# Altium PCB Expansion_Board_LDO Ver_for_MSP430.PcbDoc (part 1 of 2)
Units mil, origin at the board's own origin, x right, y up, seen from the top; angles counter-clockwise.
Board outline 6000 x 4000 mil, 2 copper layers (Top Layer, Bottom Layer); 157 components, 146 nets, 583 pads, 420 vias.
Unrouted connection lines stored in the file: 1.
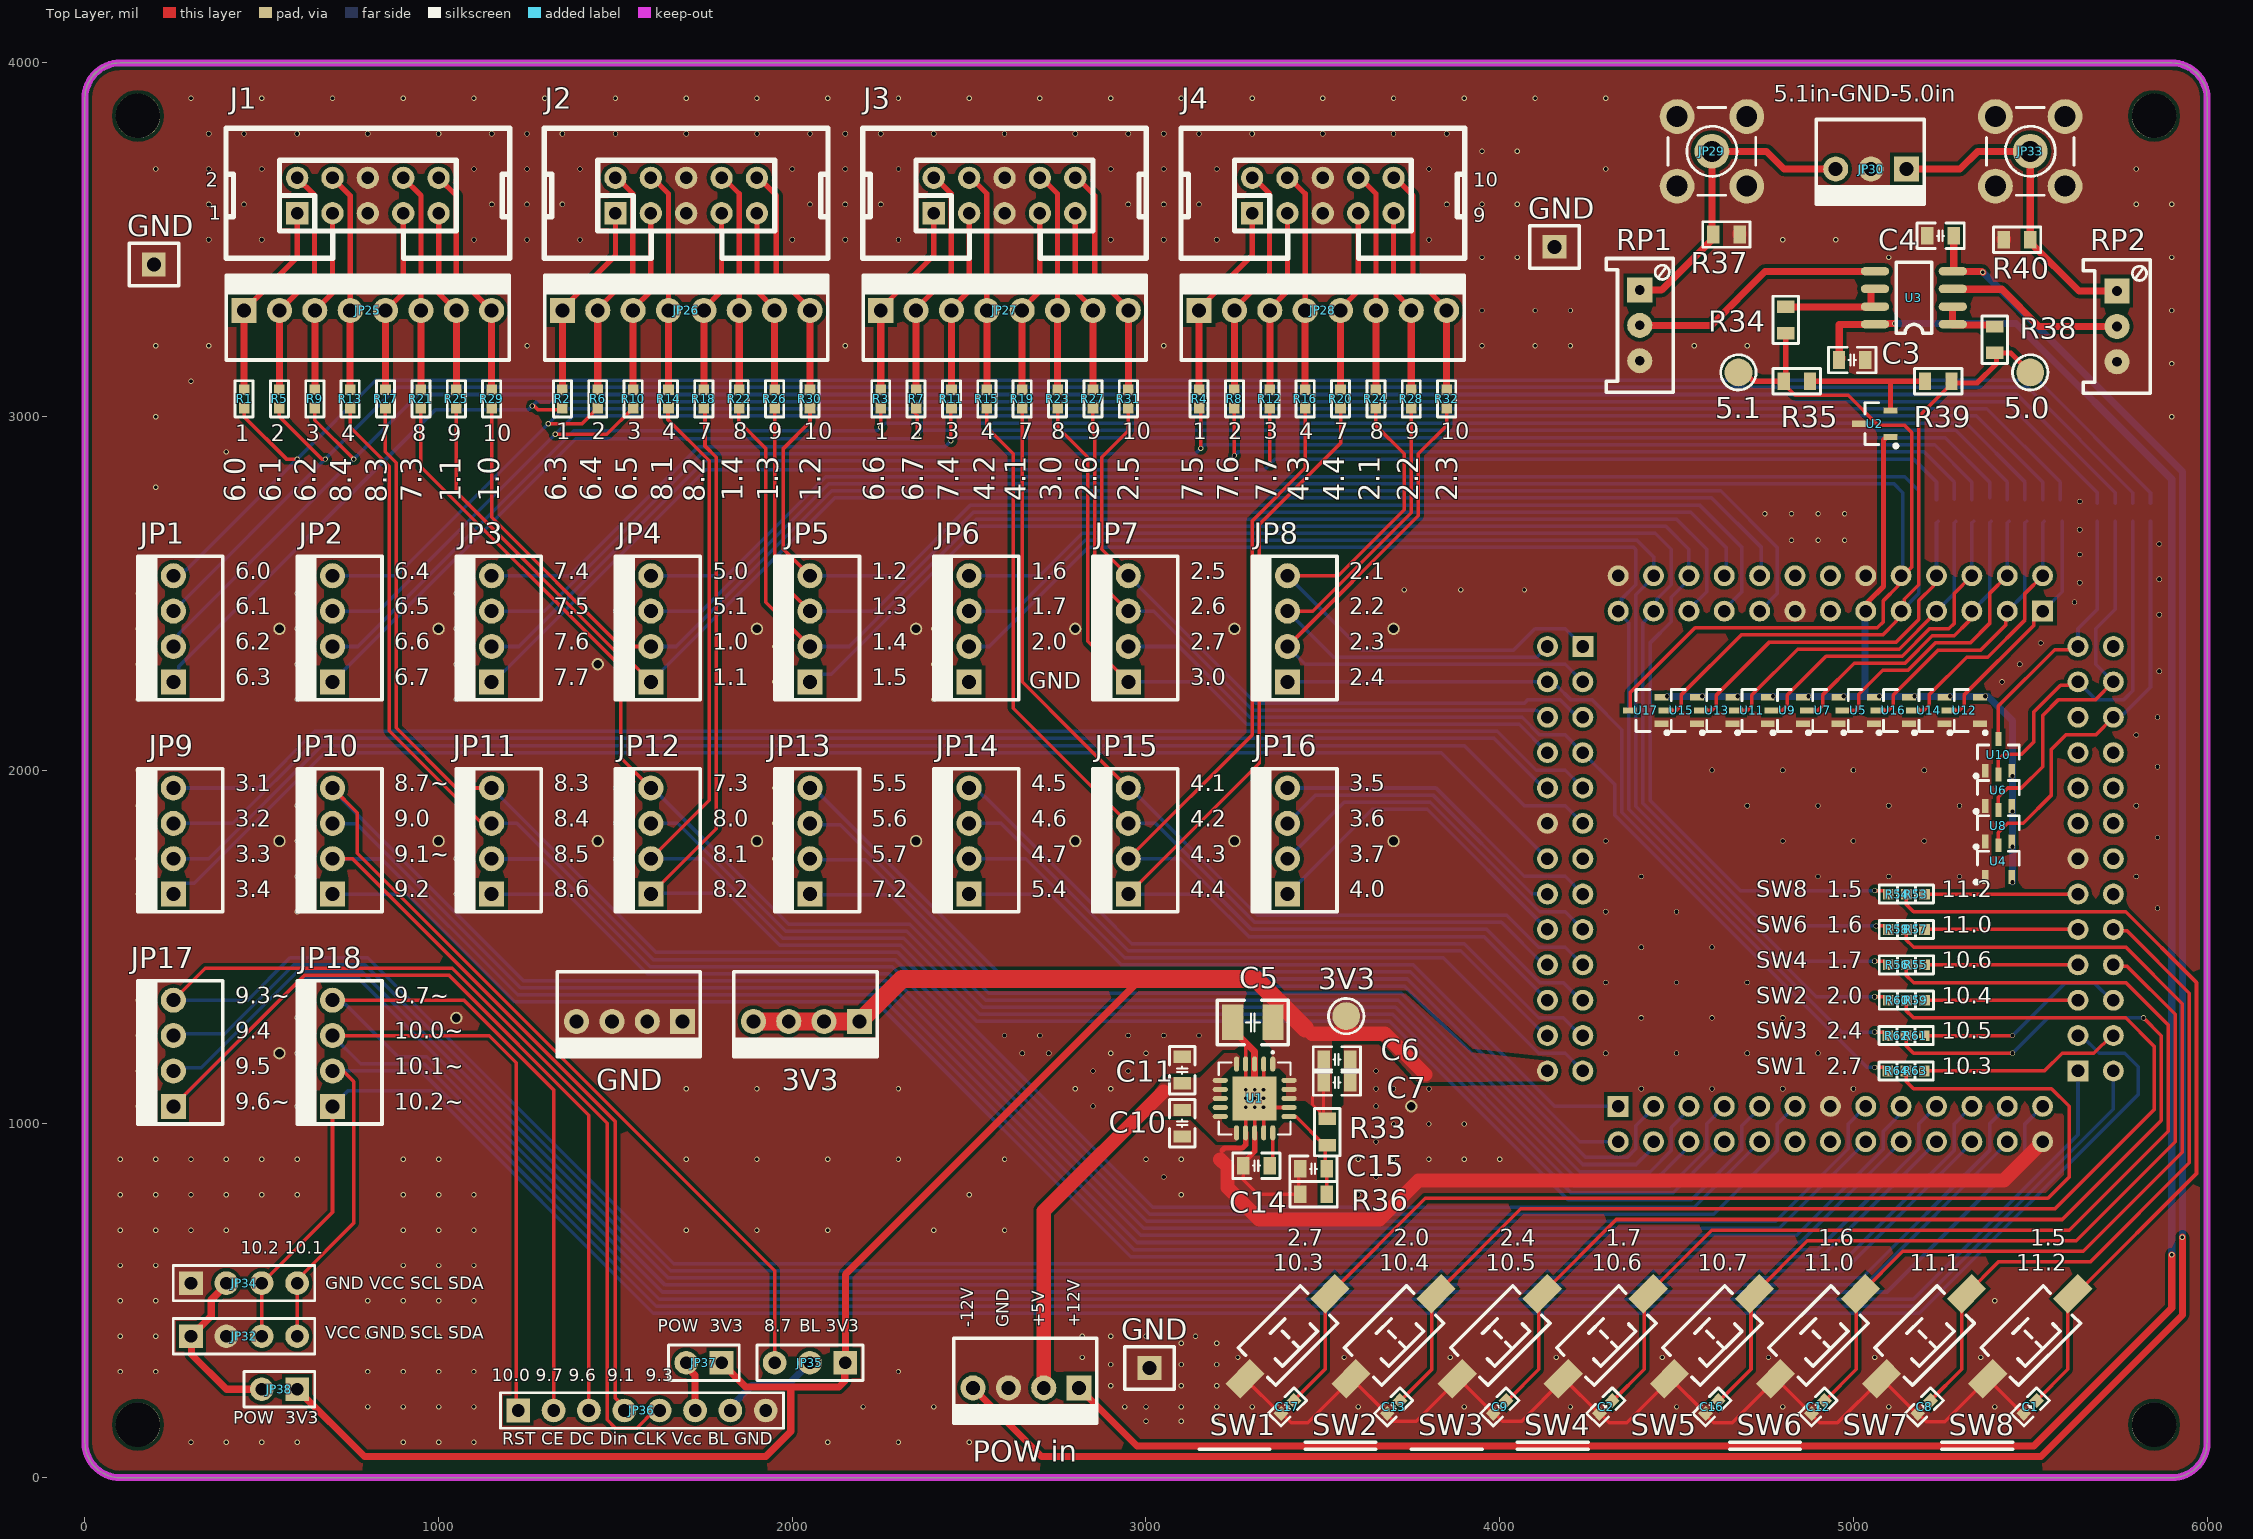
[diagram p0: Top Layer view]
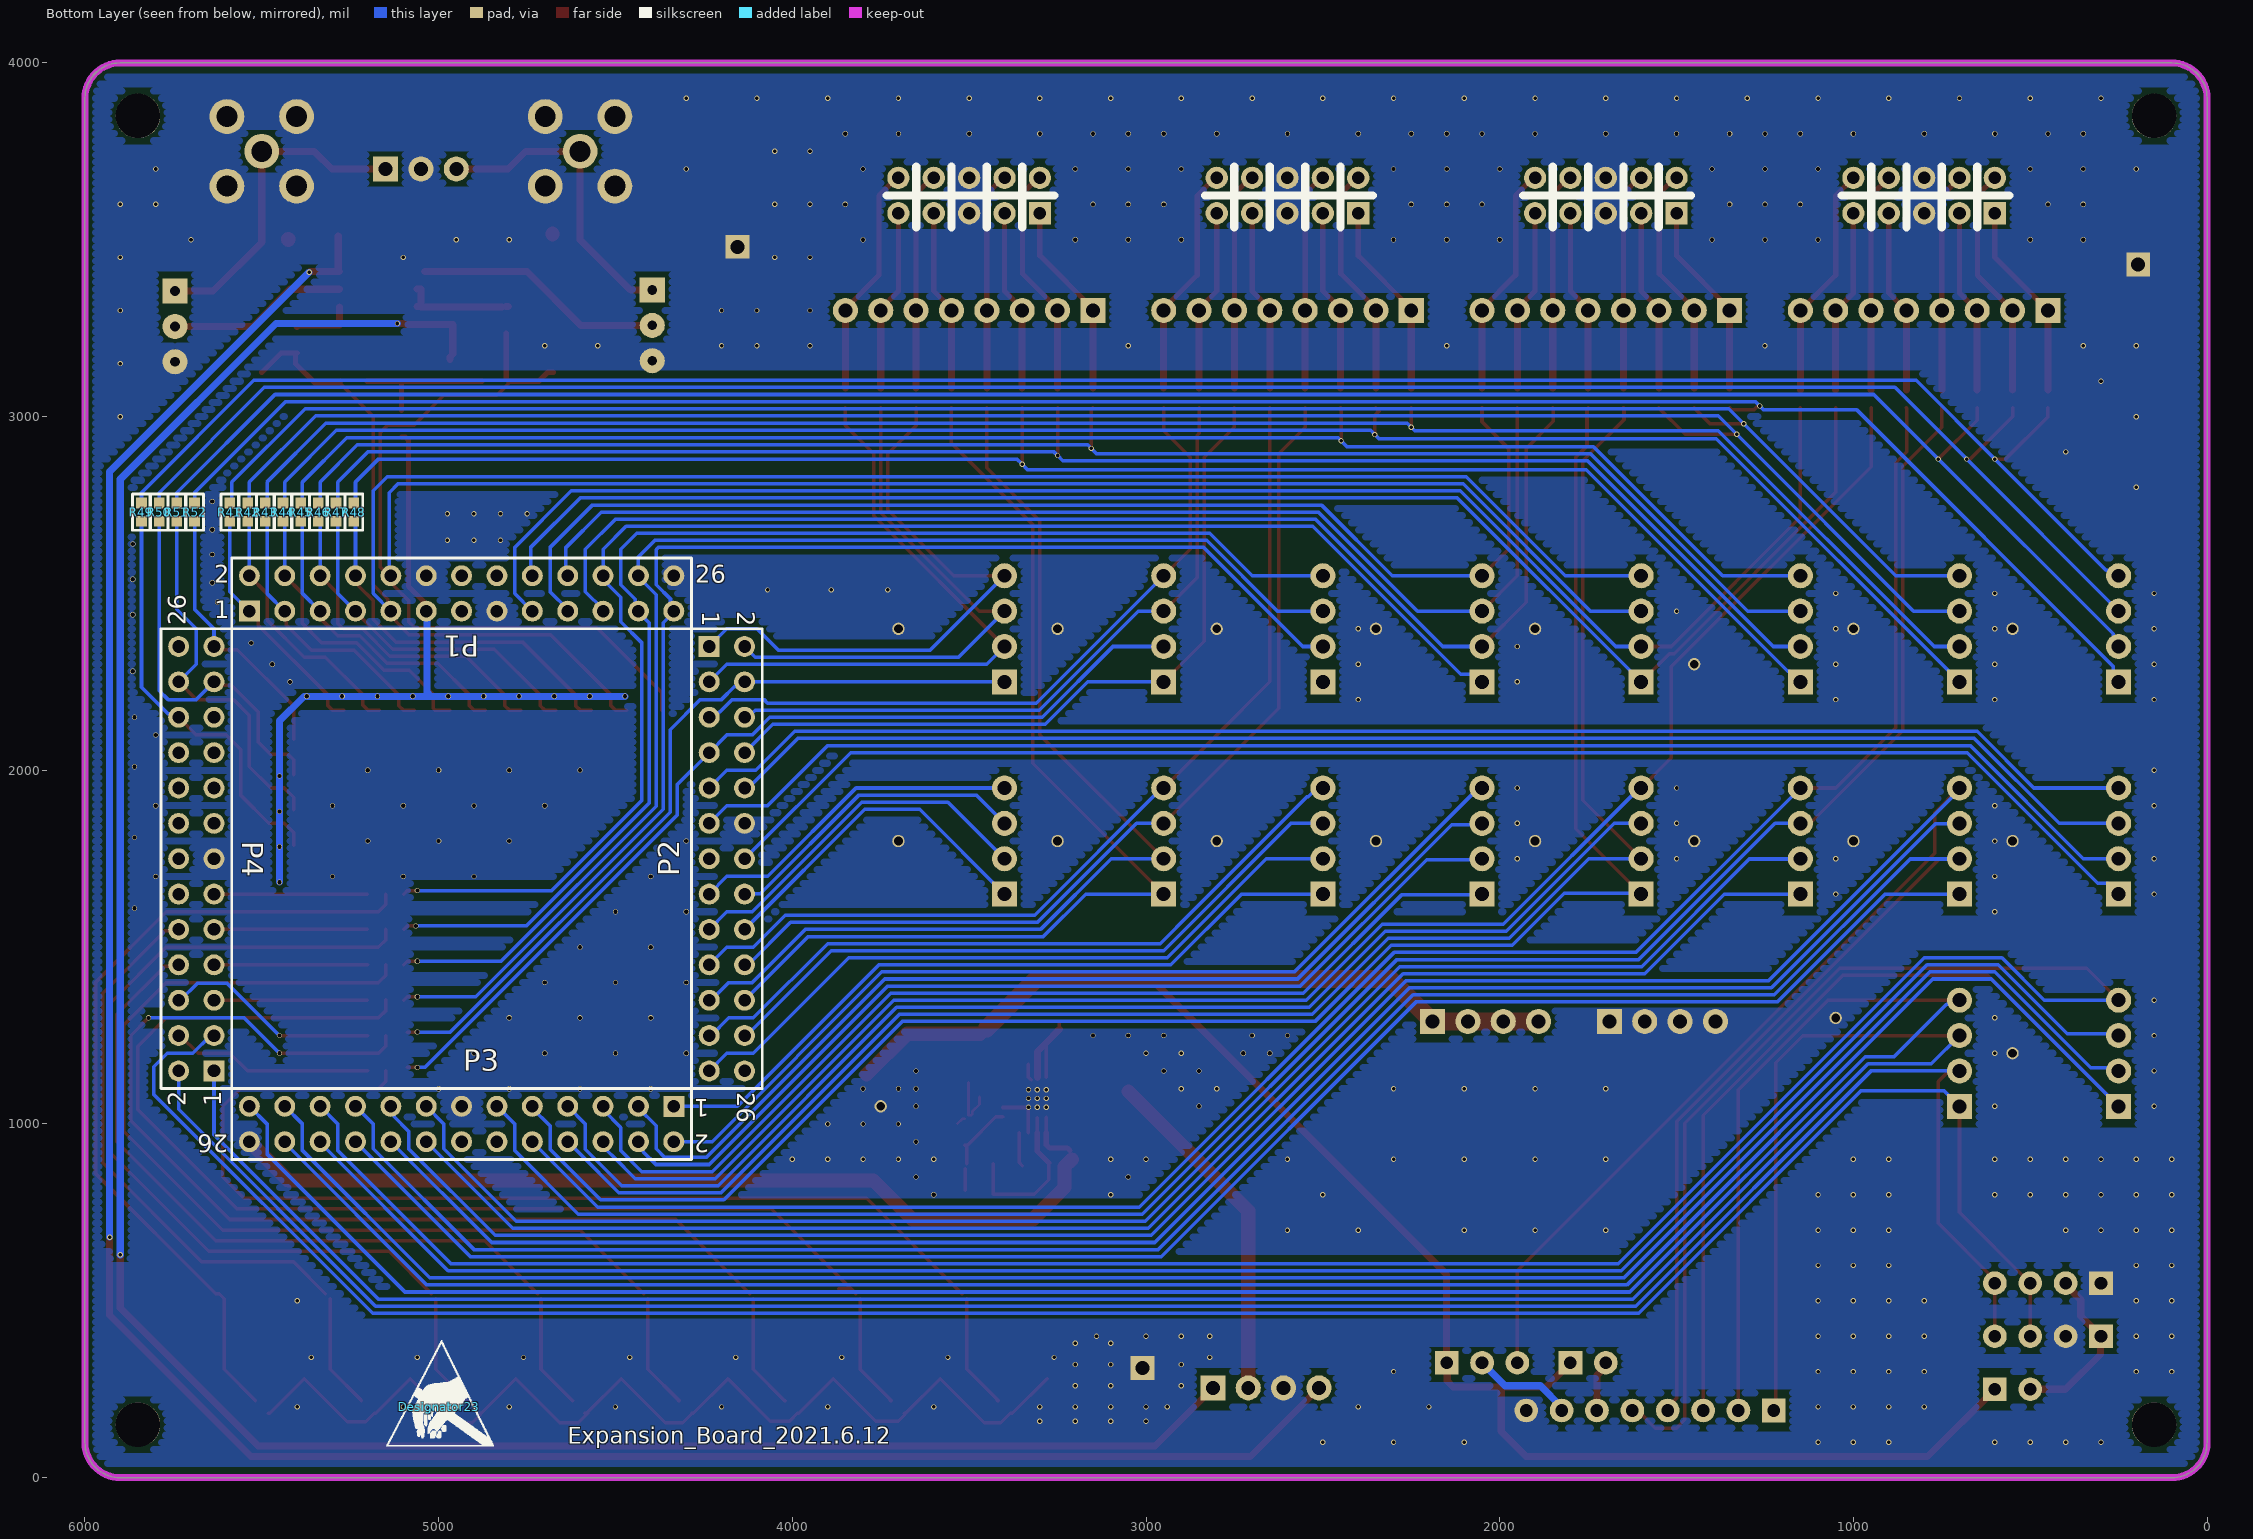
[diagram p1: Bottom Layer view, seen from below]

## Layer stack, top to bottom
Top Solder: solder mask 0.4, Solder Resist, Dk 3.5
Top Layer: signal copper 1.4
Dielectric 1: dielectric 12.6, FR-4, Dk 4.8
Bottom Layer: signal copper 1.4
Bottom Solder: solder mask 0.4, Solder Resist, Dk 3.5

## Board outline
100,0 cw(c100,100) 0,100 0,3900 cw(c100,3900) 100,4000 5900,4000 cw(c5900,3900) 6000,3900 6000,100 cw(c5900,100) 5900,0

## Design rules (kind name [scope] priority, off if disabled: settings)
Clearance [All] p1: gap=10 ignorepadtopadclearanceinfootprint=FALSE except(0: Arc-Text Arc-Hole Track-Text Track-Hole SMDPad-Text SMDPad-Hole THPad-Text THPad-Hole Via-Text Via-Hole Fill-Text Fill-Hole Poly-Text Poly-Hole Region-Text Region-Hole Text-Text Text-Hole; 15: SMDPad-Fill SMDPad-Region)
HoleSize [All] p1: absolutevalues=TRUE maxlimit=1000 minlimit=10 maxpercent=80.000 minpercent=20.000
MinimumSolderMaskSliver [All] p1 off: minsoldermaskwidth=10
PolygonConnect PolygonConnect_2 [InNet('+5')] p1: connectstyle=Direct reliefconductorwidth=10 reliefentries=4 polygonreliefangle="90 Angle" airgapwidth=10
PolygonConnect PolygonConnect_1 [InNet('GND')] p2: connectstyle=Direct reliefconductorwidth=30 reliefentries=4 polygonreliefangle="90 Angle" airgapwidth=10
PolygonConnect [InNet('VCC')] p3: connectstyle=Direct reliefconductorwidth=30 reliefentries=4 polygonreliefangle="90 Angle" airgapwidth=20
RoutingVias [All] p1: holewidth=28 width=50 viastyle="Through Hole" minholewidth=28 minwidth=50 maxholewidth=28 maxwidth=50
SilkToSilkClearance [All] p1 off: silktosilkclearance=10
SilkToSolderMaskClearance [IsPad] p1 off: minsilkscreentomaskgap=10 clearancetoexposedcopper=TRUE
SolderMaskExpansion [All] p1: expansion=4 istentingtop=FALSE
Width [All] p1 off: maxlimit=10 minlimit=10 preferedwidth=10
26 further rules are at their usual default settings.

## Classes and differential pairs
component class "Expansion Board": 1 2 3 C3 C4 C5 C6 C10 C11 C13 C14 C15 C16 C17 GND2 J1 J2 J3 J4 JP1 JP2 JP5 JP9 JP12 JP18 JP19 JP20 JP21 JP22 JP23 JP25 JP26 JP27 JP28 JP29 JP30 JP31 P1 P4 "POW in1" R3 R4 R8 R9 R10 R14 R16 R17 R21 R22 R24 R25 R26 R27 R31 R33 R35 R37 R38 R39 R40 R43 R46 R47 R53 R55 R57 R58 R59 R60 R61 R63 RP1 RP2 SW1 SW2 SW3 SW4 SW5 SW6 SW7 SW8 U2 U3 U4 U8 U9 U11 U12 U13 U14 U17

## Components (designator, comment, footprint, x,y, rotation, side; value= is the part's Value field where it differs from the comment)
3V3 "3V3" "TEST 2.0" 3566,1305 r0 top
3V3 "HDR-1X4" KF2510-LI-4P 2040,1290 r180 top
5.0 "3V3" "TEST 2.0" 5500,3125 r0 top
5.1 "3V3" "TEST 2.0" 4675,3125 r0 top
C1 "104" "C 0603_L" 5500,200 r225 top
C2 "104" "C 0603_L" 4300,200 r225 top
C3 "104" "C 0805_L" 4996.6,3160 r180 top
C4 "104" "C 0805_L" 5246.4,3511 r0 top
C5 "106" "C 1210_L" 3302.2,1287.2 r180 top
C6 "475" "C 0805_L" 3539.6,1182.2 r180 top
C7 "105" "C 0805_L" 3539.6,1117.2 r180 top
C8 "104" "C 0603_L" 5200,200 r225 top
C9 "104" "C 0603_L" 4000,200 r225 top
C10 "475" "C 0805_L" 3102.2,1002.2 r90 top
C11 "105" "C 0805_L" 3102.2,1152.2 r270 top
C12 "104" "C 0603_L" 4900,200 r225 top
C13 "104" "C 0603_L" 3700,200 r225 top
C14 "223" "C 0805_L" 3312.2,882.2 r0 top
C15 "101" "C 0805_L" 3473.2,873.2 r0 top
C16 "104" "C 0603_L" 4600,200 r225 top
C17 "104" "C 0603_L" 3400,200 r225 top
Designator23 "Comment" ICO1 5000,200 r180 bottom
GND "HDR-1X4" KF2510-LI-4P 1540,1290 r180 top
GND "TEST TP" "TEST TP1.4_BK" 4155,3480 r0 top
GND "TEST TP" "TEST TP1.4_BK" 195,3430 r0 top
GND "TEST TP" "TEST TP1.4_BK" 3010,310 r0 top
J1 "Header 5X2" IDC2.54-LI-2x5P 600,3575 r0 top
J2 "Header 5X2" IDC2.54-LI-2x5P 1500,3575 r0 top
J3 "Header 5X2" IDC2.54-LI-2x5P 2400,3575 r0 top
J4 "Header 5X2" IDC2.54-LI-2x5P 3300,3575 r0 top
JP1 "HDR-1X4" KF2510-LI-4P 250,2400 r90 top
JP2 "HDR-1X4" KF2510-LI-4P 700,2400 r90 top
JP3 "HDR-1X4" KF2510-LI-4P 1150,2400 r90 top (schematic designator JP12)
JP4 "HDR-1X4" KF2510-LI-4P 1600,2400 r90 top (schematic designator JP5)
JP5 "HDR-1X4" KF2510-LI-4P 2050,2400 r90 top (schematic designator JP15)
JP6 "HDR-1X4" KF2510-LI-4P 2500,2400 r90 top (schematic designator JP7)
JP7 "HDR-1X4" KF2510-LI-4P 2950,2400 r90 top (schematic designator JP8)
JP8 "HDR-1X4" KF2510-LI-4P 3400,2400 r90 top (schematic designator JP9)
JP9 "HDR-1X4" KF2510-LI-4P 250,1800 r90 top (schematic designator JP10)
JP10 "HDR-1X4" KF2510-LI-4P 700,1800 r90 top (schematic designator JP11)
JP11 "HDR-1X4" KF2510-LI-4P 1150,1800 r90 top (schematic designator JP4)
JP12 "HDR-1X4" KF2510-LI-4P 1600,1800 r90 top (schematic designator JP14)
JP13 "HDR-1X4" KF2510-LI-4P 2050,1800 r90 top (schematic designator JP6)
JP14 "HDR-1X4" KF2510-LI-4P 2500,1800 r90 top (schematic designator JP16)
JP15 "HDR-1X4" KF2510-LI-4P 2950,1800 r90 top (schematic designator JP17)
JP16 "HDR-1X4" KF2510-LI-4P 3400,1800 r90 top (schematic designator JP18)
JP17 "HDR-1X4" KF2510-LI-4P 250,1200 r90 top (schematic designator JP3)
JP18 "HDR-1X4" KF2510-LI-4P 700,1200 r90 top (schematic designator JP13)
JP25 "HDR-1X8" KF2510-LI-8P 800,3300 r0 top
JP26 "HDR-1X8" KF2510-LI-8P 1700,3300 r0 top
JP27 "HDR-1X8" KF2510-LI-8P 2600,3300 r0 top
JP28 "HDR-1X8" KF2510-LI-8P 3500,3300 r0 top
JP29 "SMA" SMA_FR 4600,3750 r0 top
JP30 "HDR-1X3" KF2510-LI-3P 5050,3700 r180 top
JP32 "HDR-1X4" HDR2.54-M-LI-4P 450,400 r0 top
JP33 "SMA" SMA_FR 5500,3750 r0 top
JP34 "HDR-1X4" HDR2.54-M-LI-4P 450,550 r0 top
JP35 "HDR-1X3" HDR2.54-LI-3P 2050,325 r180 top
JP36 "HDR-1X8" HDR2.54-M-LI-8P 1575,190 r0 top
JP37 "HDR-1X2" HDR2.54-LI-2P 1750,325 r180 top
JP38 "HDR-1X2" HDR2.54-LI-2P 550,250 r180 top
P1 "Header 13X2H" HDR2X13 5535,2450 r180 bottom
P2 "Header 13X2H" HDR2X13 4235,2350 r270 bottom
P3 "Header 13X2H" HDR2X13 4335,1050 r0 bottom
P4 "Header 13X2H" HDR2X13 5635,1150 r90 bottom
"POW in" "HDR-1X4" KF2510-LI-4P 2661,254 r180 top (schematic designator JP31)
R1 "0" "R 0603_L" 450,3050 r90 top
R2 "0" "R 0603_L" 1350,3050 r90 top
R3 "0" "R 0603_L" 2250,3050 r90 top
R4 "0" "R 0603_L" 3150,3050 r90 top
R5 "0" "R 0603_L" 550,3050 r90 top
R6 "0" "R 0603_L" 1450,3050 r90 top
R7 "0" "R 0603_L" 2350,3050 r90 top
R8 "0" "R 0603_L" 3250,3050 r90 top
R9 "0" "R 0603_L" 650,3050 r90 top
R10 "0" "R 0603_L" 1550,3050 r90 top
R11 "0" "R 0603_L" 2450,3050 r90 top
R12 "0" "R 0603_L" 3350,3050 r90 top
R13 "0" "R 0603_L" 750,3050 r90 top
R14 "0" "R 0603_L" 1650,3050 r90 top
R15 "0" "R 0603_L" 2550,3050 r90 top
R16 "0" "R 0603_L" 3450,3050 r90 top
R17 "0" "R 0603_L" 850,3050 r90 top
R18 "0" "R 0603_L" 1750,3050 r90 top
R19 "0" "R 0603_L" 2650,3050 r90 top
R20 "0" "R 0603_L" 3550,3050 r90 top
R21 "0" "R 0603_L" 950,3050 r90 top
R22 "0" "R 0603_L" 1850,3050 r90 top
R23 "0" "R 0603_L" 2750,3050 r90 top
R24 "0" "R 0603_L" 3650,3050 r90 top
R25 "0" "R 0603_L" 1050,3050 r90 top
R26 "0" "R 0603_L" 1950,3050 r90 top
R27 "0" "R 0603_L" 2850,3050 r90 top
R28 "0" "R 0603_L" 3750,3050 r90 top
R29 "0" "R 0603_L" 1150,3050 r90 top
R30 "0" "R 0603_L" 2050,3050 r90 top
R31 "0" "R 0603_L" 2950,3050 r90 top
R32 "0" "R 0603_L" 3850,3050 r90 top
R33 "5.1K" "R 0805_L" 3512.2,977.2 r90 top
R34 "10K" "R 0805_L" 4809.07,3273.38 r90 top
R35 "10K" "R 0805_L" 4840,3100 r180 top
R36 "1.6K" "R 0805_L" 3473.81,801.21 r0 top
R37 "50R" "R 0805_L" 4640.8,3514.93 r180 top
R38 "10K" "R 0805_L" 5400,3217.4 r90 top
R39 "10K" "R 0805_L" 5240,3100 r0 top
R40 "50R" "R 0805_L" 5462.6,3500 r0 top
R41 "1K" "R 0603_L" 5590,2730 r270 bottom
R42 "1K" "R 0603_L" 5540,2730 r90 bottom
R43 "1K" "R 0603_L" 5490,2730 r270 bottom
R44 "1K" "R 0603_L" 5440,2730 r90 bottom
R45 "1K" "R 0603_L" 5390,2730 r270 bottom
R46 "1K" "R 0603_L" 5340,2730 r90 bottom
R47 "1K" "R 0603_L" 5290,2730 r270 bottom
R48 "1K" "R 0603_L" 5240,2730 r90 bottom
R49 "1K" "R 0603_L" 5840,2730 r90 bottom
R50 "1K" "R 0603_L" 5790,2730 r90 bottom
R51 "1K" "R 0603_L" 5740,2730 r90 bottom
R52 "1K" "R 0603_L" 5690,2730 r90 bottom
R53 "0" "R 0603_L" 5175.59,1650 r0 top
R54 "0" "R 0603_L" 5124.41,1650 r180 top
R55 "0" "R 0603_L" 5175.59,1450 r0 top
R56 "0" "R 0603_L" 5124.41,1450 r180 top
R57 "0" "R 0603_L" 5175.59,1550 r0 top
R58 "0" "R 0603_L" 5124.41,1550 r180 top
R59 "0" "R 0603_L" 5175.59,1350 r0 top
R60 "0" "R 0603_L" 5124.41,1350 r180 top
R61 "0" "R 0603_L" 5174.41,1250 r0 top
R62 "0" "R 0603_L" 5123.23,1250 r180 top
R63 "0" "R 0603_L" 5174.41,1150 r0 top
R64 "0" "R 0603_L" 5123.23,1150 r180 top
RP1 "10K" 3296W 4396,3258 r270 top
RP2 "10K" 3296W 5745,3255 r270 top
SW1 "3x6x5" "TSW SMD-3*6*4.3" 3400,400 r225 top
SW2 "3x6x5" "TSW SMD-3*6*4.3" 3700,400 r225 top
SW3 "3x6x5" "TSW SMD-3*6*4.3" 4000,400 r225 top
SW4 "3x6x5" "TSW SMD-3*6*4.3" 4300,400 r225 top
SW5 "3x6x5" "TSW SMD-3*6*4.3" 4600,400 r225 top
SW6 "3x6x5" "TSW SMD-3*6*4.3" 4900,400 r225 top
SW7 "3x6x5" "TSW SMD-3*6*4.3" 5200,400 r225 top
SW8 "3x6x5" "TSW SMD-3*6*4.3" 5500,400 r225 top
U1 "TPS74401" TPS74401 3307.8,1069.39 r270 top
U2 "REF3025" SOT23-3L 5060,2980 r90 top
U3 "LM358" SOP8 5280,3260 r180 top
U4 "BAT54S" SOT23-3L 5410,1743.78 r0 top
U5 "BAT54S" SOT23-3L 5012.77,2169.14 r90 top
U6 "BAT54S" SOT23-3L 5410,1943.78 r0 top
U7 "BAT54S" SOT23-3L 4912.77,2169.14 r90 top
U8 "BAT54S" SOT23-3L 5410,1843.78 r0 top
U9 "BAT54S" SOT23-3L 4812.77,2169.14 r90 top
U10 "BAT54S" SOT23-3L 5410,2043.78 r0 top
U11 "BAT54S" SOT23-3L 4712.77,2169.14 r90 top
U12 "BAT54S" SOT23-3L 5312.77,2169.14 r90 top
U13 "BAT54S" SOT23-3L 4612.77,2169.14 r90 top
U14 "BAT54S" SOT23-3L 5212.77,2169.14 r90 top
U15 "BAT54S" SOT23-3L 4512.77,2169.14 r90 top
U16 "BAT54S" SOT23-3L 5112.77,2169.14 r90 top
U17 "BAT54S" SOT23-3L 4412.77,2169.14 r90 top

## Footprints (in the part's own frame and the unit in brackets; to place one, negate y for a bottom-side part, rotate by r counter-clockwise, add the part's x,y. Pads: shape width x height; smd on the part's side, far side on the other; paste and mask are expansions set on the pad)
3296W [mm] "Precise Multi-Winding Adjustable Resistor"
  rect 1.8x1.8 hole 0.7: 1(-2.54,0)
  round 1.8 hole 0.7: 2(0,0) 3(2.54,0)
  silkscreen extent -4.8,-2.4 4.8,2.4, body extent -4.75,-2.4 4.75,2.4, height 11.52
"C 0603_L" [mil] "无极性贴片电容"
  rect 30x30 smd: 1(-25.59,0) 2(25.59,0)
  silkscreen extent -51,-26 51,26, body extent -31,-16 31,16, height 32
"C 0805_L" [mil] "无极性贴片电容"
  rect 35x50 smd: 1(-37.4,0) 2(37.4,0)
  silkscreen extent -67,-36 67,36, body extent -39,-24 39,24, height 20
"C 1210_L" [mil] "无极性贴片电容"
  rect 60x100 smd: 1(-57.09,0) 2(57.09,0)
  silkscreen extent -100,-63 100,63, body extent -63,-51 63,51, height 60
HDR2.54-LI-2P [mm]
  rect 1.7x1.7 hole 0.9: 1(-1.27,0)
  round 1.7 hole 0.9: 2(1.27,0)
  silkscreen extent -2.54,-1.27 2.54,1.27, body extent -2.54,-1.27 2.54,1.27, height 8.5
HDR2.54-LI-3P [mm] "排针，3脚"
  rect 1.7x1.7 hole 0.9: 1(-2.54,0)
  round 1.7 hole 0.9: 2(0,0) 3(2.54,0)
  silkscreen extent -3.81,-1.27 3.81,1.27, body extent -3.81,-1.27 3.81,1.27, height 8.5
HDR2.54-M-LI-4P [mm] "排母，4脚"
  rect 1.7x1.7 hole 0.9: 1(-3.81,0)
  round 1.7 hole 0.9: 2(-1.27,0) 3(1.27,0) 4(3.81,0)
  silkscreen extent -5.08,-1.27 5.08,1.27, body extent -5.08,-1.27 5.08,1.27, height 8.5
HDR2.54-M-LI-8P [mm] "排母，8脚"
  rect 1.7x1.7 hole 0.9: 1(-8.89,0)
  round 1.7 hole 0.9: 2(-6.35,0) 3(-3.81,0) 4(-1.27,0) 5(1.27,0) 6(3.81,0) 7(6.35,0) 8(8.89,0)
  silkscreen extent -10.16,-1.27 10.16,1.27, body extent -10.16,-1.27 10.16,1.27, height 8.5
HDR2X13 [mm] "Connector; Header; 13x2 Position"
  rect 1.5x1.5 hole 0.9: 1(0,0)
  round 1.5 hole 0.9: 2(0,2.54) 3(2.54,0) 4(2.54,2.54) 5(5.08,0) 6(5.08,2.54) 7(7.62,0) 8(7.62,2.54) 9(10.16,0) 10(10.16,2.54) 11(12.7,0) 12(12.7,2.54) 13(15.24,0) 14(15.24,2.54) 15(17.78,0) 16(17.78,2.54) 17(20.32,0) 18(20.32,2.54) 19(22.86,0) 20(22.86,2.54) 21(25.4,0) 22(25.4,2.54) 23(27.94,0) 24(27.94,2.54) 25(30.48,0) 26(30.48,2.54)
  silkscreen extent -1.27,-1.27 31.75,3.81
ICO1 [mil]
  silkscreen extent -148,-111 156,187
IDC2.54-LI-2x5P [mm] "10P简易牛角座"
  rect 1.6x1.6 hole 0.9: 1(0,0)
  round 1.6 hole 0.9: 2(0,2.54) 3(2.54,0) 4(2.54,2.54) 5(5.08,0) 6(5.08,2.54) 7(7.62,0) 8(7.62,2.54) 9(10.16,0) 10(10.16,2.54)
  silkscreen extent -5.11,-3.23 15.27,6.1, body extent -5.08,-3.08 15.24,5.77, height 9.17
KF2510-LI-3P [mm] "接插件/2A"
  rect 1.8x1.8 hole 1: 1(-2.54,0)
  round 1.8 hole 1: 2(0,0) 3(2.54,0)
  silkscreen extent -3.81,-3.56 3.94,2.54, body extent -3.81,-3.5 3.81,2.4, height 11.05
KF2510-LI-4P [mm] "接插件/2A"
  rect 1.8x1.8 hole 1: 1(-3.81,0)
  round 1.8 hole 1: 2(-1.27,0) 3(1.27,0) 4(3.81,0)
  silkscreen extent -5.08,-3.56 5.21,2.54, body extent -5.08,-3.5 5.08,2.4, height 11.05
KF2510-LI-8P [mm] "接插件/2A"
  rect 1.8x1.8 hole 1: 1(-8.89,0)
  round 1.8 hole 1: 2(-6.35,0) 3(-3.81,0) 4(-1.27,0) 5(1.27,0) 6(3.81,0) 7(6.35,0) 8(8.89,0)
  silkscreen extent -10.16,-3.56 10.16,2.54, body extent -10.16,-3.5 10.16,2.4, height 11.05
"R 0603_L" [mil] "1/10W贴片电阻 https://item.taobao.com/item.htm?ft=t&id=613637044352"
  rect 30x30 smd: 1(-25.59,0) 2(25.59,0)
  silkscreen extent -51,-26 51,26, body extent -31,-16 32,16, height 16
"R 0805_L" [mil] "1/8W贴片电阻   https://item.taobao.com/item.htm?ft=t&id=613637044352"
  rect 35x50 smd: 1(-37.4,0) 2(37.4,0)
  silkscreen extent -67,-36 67,36, body extent -39,-25 39,25, height 20
SMA_FR [mm] "SMA 90度射频天线座"
  round 2.5 hole 1.5: 1(0,0) 2(-2.5,2.5) 2(2.5,2.5) 3(-2.5,-2.5) 3(2.5,-2.5)
  silkscreen extent -3.15,-3.15 3.15,3.15, body extent -3.5,-3.5 3.5,11.6, height 10.26
SOP8 [mil] "https://item.taobao.com/item.htm?ft=t&id=613637044352"
  oval 80x24 smd: 1(-1,-1) 2(-1,-51) 3(-1,-101) 4(-1,-151) 5(219,-151) 6(219,-101) 7(219,-51) 8(219,-1)
  silkscreen extent 59,-176 159,24, body extent -4,-174 234,24, height 63
SOT23-3L [mm] "3x1.3x1mm(长宽高)"
  rect 0.45x1 smd: 1(-0.95,-1.143) 2(0.95,-1.143) 3(0,1.125)
  silkscreen extent -1.72,-1.65 1.5,0.7, body extent -1.5,-1.2 1.5,1.2, height 1.05
"TEST 2.0" [mm] "测试点2.0mm"
  round 2 smd paste-2: 1(0,0)
  silkscreen extent -1.27,-1.27 1.27,1.27
"TEST TP1.4_BK" [mm] "黑色，测试环"
  rect 1.7x1.7 hole 1: 1(0,0)
  silkscreen extent -1.78,-1.52 1.78,1.52, body extent -1.67,-1.4 1.67,1.4, height 5.41
TPS74401 [mm]
  oval 1.087x0.364 smd: 1(-2.54,1.285) 2(-2.54,0.635) 3(-2.54,-0.015) 4(-2.54,-0.665) 5(-2.54,-1.315) 11(2.397,-1.315) 12(2.397,-0.665) 13(2.397,-0.015) 14(2.397,0.635) 15(2.397,1.285)
  oval 0.364x1.087 smd: 6(-1.371,-2.484) 7(-0.722,-2.484) 8(-0.072,-2.484) 9(0.579,-2.484) 10(1.228,-2.484) 16(1.228,2.453) 17(0.579,2.453) 18(-0.072,2.453) 19(-0.722,2.453) 20(-1.371,2.453)
  rect 3.15x3.15 smd: 21(-0.072,-0.015)
  silkscreen extent -3.46,-2.59 2.5,2.56
"TSW SMD-3*6*4.3" [mm] "3*6*4.3mm"
  rect 2.5x1.5 smd: 1(-4.318,0) 2(4.318,0)
  silkscreen extent -3.21,-1.9 3.09,1.9, body extent -4.6,-1.75 4.6,1.75, height 4.4

## Part data
3V3 5.0 5.1: library part TEST, "测试点", BOM名称=测试点, 下单链接=https://item.taobao.com/item.htm?ft=t&id=613637044352, 淘宝ID=小糖豆的小窝窝
3V3 GND JP1 JP2 JP3 JP4 JP5 JP6 JP7 JP8 JP9 JP10 JP11 JP12 JP13 JP14 JP15 JP16 JP17 JP18 JP32 JP34 "POW in": library part "Header 4", "4P接插件", BOM名称=4P接插件, 下单链接=https://item.taobao.com/item.htm?ft=t&id=613637044352, 淘宝ID=小糖豆的小窝窝
C1 C2 C3 C4 C5 C6 C7 C8 C9 C10 C11 C12 C13 C14 C15 C16 C17: library part C, "贴片电容", BOM名称=贴片电容, 下单链接=https://item.taobao.com/item.htm?ft=t&id=613637044352, 淘宝ID=小糖豆的小窝窝
GND GND GND: "测试环", BOM名称=测试环, 下单链接=https://item.taobao.com/item.htm?ft=t&id=613637044352, 淘宝ID=小糖豆的小窝窝
J1 J2 J3 J4: "5*2P接插件", BOM名称=5*2P接插件, 下单链接=https://item.taobao.com/item.htm?ft=t&id=613637044352, 淘宝ID=小糖豆的小窝窝
JP25 JP26 JP27 JP28 JP36: library part "Header 8", "8P接插件", BOM名称=8P接插件, 下单链接=https://item.taobao.com/item.htm?ft=t&id=613637044352, 淘宝ID=小糖豆的小窝窝
JP29 JP33: library part "SMA WIFI", "SMA-2.4G射频天线接口", BOM名称=SMA-2.4G射频天线接口, 下单链接=https://item.taobao.com/item.htm?ft=t&id=613637044352, 淘宝ID=小糖豆的小窝窝
JP30 JP35: library part "Header 3", "3P接插件", BOM名称=3P接插件, 下单链接=https://item.taobao.com/item.htm?ft=t&id=613637044352, 淘宝ID=小糖豆的小窝窝
JP37 JP38: library part "Header 2", "2P接插件", BOM名称=2P接插件, 下单链接=https://item.taobao.com/item.htm?ft=t&id=613637044352, 淘宝ID=小糖豆的小窝窝
P1 P2 P3 P4: "Header, 13-Pin, Dual row, Right Angle", LatestRevisionDate=17-Jul-2002, LatestRevisionNote="Re-released for DXP Platform.", Publisher="Altium Limited"
R1 R2 R3 R4 R5 R6 R7 R8 R9 R10 R11 R12 R13 R14 R15 R16 R17 R18 R19 R20 R21 R22 R23 R24 R25 R26 R27 R28 R29 R30 R31 R32 R33 R34 R35 R36 R37 R38 R39 R40 R41 R42 R43 R44 R45 R46 R47 R48 R49 R50 R51 R52 R53 R54 R55 R56 R57 R58 R59 R60 R61 R62 R63 R64: library part R, "贴片电阻", BOM名称=贴片电阻, 下单链接=https://item.taobao.com/item.htm?ft=t&id=613637044352, 淘宝ID=小糖豆的小窝窝
RP1 RP2: library part RP, "单联电位器", BOM名称=单联电位器, 下单链接=https://item.taobao.com/item.htm?ft=t&id=613637044352, 淘宝ID=小糖豆的小窝窝
SW1 SW2 SW3 SW4 SW5 SW6 SW7 SW8: library part "TSW 3x6", "3x6轻触开关", BOM名称=3x6轻触开关, 下单链接=https://item.taobao.com/item.htm?ft=t&id=613637044352, 淘宝ID=小糖豆的小窝窝
U3: "双运放", Alias1=https://item.taobao.com/item.htm?ft=t&id=613637044352, BOM名称=双运放, 淘宝ID=小糖豆的小窝窝

## Free pads (board coordinates)
  round 125.98 hole 125.98: Q(150,150) Q(150,3850) Q(5850,150) Q(5850,3850)
  round 35 hole 25: Q(550,1200) Q(550,1800) Q(550,2400) Q(1000,1800) Q(1000,2400) Q(1050,1300) Q(1450,1800) Q(1450,2300) Q(1900,1800) Q(1900,2400) Q(2350,1800) Q(2350,2400) Q(2800,1800) Q(2800,2400) Q(3250,1800) Q(3250,2400) Q(3700,1800) Q(3700,2400) Q(3750,1050)

## Via types
v1: diameter 15, hole 10, Top Layer to Bottom Layer, tented both sides, 265 vias
v2: diameter 15, hole 12, Top Layer to Bottom Layer, tented both sides, 155 vias

## Nets (pads, with @x,y where several pads share a name; then routed paths per layer and width w, separated by ;. In a path a pad name is that pad's centre, name@x,y a point inside that pad or via, vN(x,y) a via of type N, cw(c..) or ccw(c..) an arc to the next point about the centre after c; other vN are vias at no path point)
2.5: R35.1 R39.1 U2.2 | length 409.9
  Top Layer w15: R35.1@4877.4,3100 5100,3100 ; U2.2@5105,3017.4 5105,3095 5100,3100 ; R39.1@5202.6,3100 5100,3100
+5: "POW in.2" C10.2 C11.2 U1.5 U1.6 U1.7 U1.8 U1.10 U1.11 | length 978
  Top Layer w40: 2711,254 2711,754 3049,1092
+12: "POW in.1" C3.2 U3.8 | length 6887.8
  Top Layer w20: 2811,254 2975,90 5510,90 5900,480 v1(5900,630) ; C3.2@4968.2,3161 4968.2,3168.5 4960,3176.7 4960,3260 5089.08,3260 5089.32,3260.23 5092.59,3260.23 5092.83,3260 5096.11,3263.28 v1(5116.35,3263.28)
  Bottom Layer w20: v1(5116.35,3263.28) 5459.72,3263.28 5900,2823 v1(5900,630)
-12: "POW in.4" C4.2 U3.4 | length 7035.3
  Top Layer w20: 2511,254 2705,60 5530,60 5930,460 v1(5930,680) ; U3.4@5280,3410 U3.4@5281.96,3410 ; C4.2@5283.8,3511 5283.8,3411.85 U3.4@5281.96,3410 ; v1(5366,3408) 5364,3410 U3.4@5281.96,3410
  Bottom Layer w20: v1(5366,3408) 5930,2844 v1(5930,680)
GND: "POW in.3" C1.2 C2.2 C3.1 C4.1 C5.2 C6.1 C7.1 C8.2 C9.2 C10.1 C11.1 C12.2 C13.2 C14.1 C15.1 C16.2 C17.2 GND.1 GND.2 GND.3 GND.4 J1.5 J1.6 J2.5 J2.6 J3.5 J3.6 J4.5 J4.6 JP29.2 JP29.3 JP30.2 JP32.2 JP33.2 JP33.3 JP34.1 JP36.8 P1.12 P1.15 P1.26 P2.12 P3.13 P3.26 P4.13 pad.Q@550,1200 pad.Q@550,1800 pad.Q@550,2400 pad.Q@1000,1800 pad.Q@1000,2400 pad.Q@1050,1300 pad.Q@1450,1800 pad.Q@1450,2300 pad.Q@1900,1800 pad.Q@1900,2400 pad.Q@2350,1800 pad.Q@2350,2400 pad.Q@2800,1800 pad.Q@2800,2400 pad.Q@3250,1800 pad.Q@3250,2400 pad.Q@3700,1800 pad.Q@3700,2400 pad.Q@3750,1050 R36.1 R37.1 R40.1 RP1.3 RP2.3 SW1.2 SW2.2 SW3.2 SW4.2 SW5.2 SW6.2 SW7.2 SW8.2 U1.2 U1.3 U1.4 U1.12 U1.13 U1.14 U1.17 U1.21 U2.3 U4.1 U5.1 U6.1 U7.1 U8.1 U9.1 U10.1 U11.1 U12.1 U13.1 U14.1 U15.1 U16.1 U17.1 | length 6573.4
  Top Layer w10: C5.2@3245.12,1267.2 C5.2@3245.12,1287.2 ; C14.1@3274.8,889.7 C14.1@3274.8,882.2 3274.8,842.65 3316.24,801.2 3432.2,801.2 C15.1@3432.2,887.2 ; SW1.2@3279.79,279.79 3377.67,181.91 C17.2@3381.9,181.91 ; U1.12@3281.61,975.02 U1.21@3281.61,1018.39 ; U1.21@3281.61,1131.61 U1.4@3281.61,1169.39 3281.61,1230.71 ; U1.13@3307.2,975.02 U1.21@3307.2,1017.8 ; U1.21@3325,1125 3332.8,1132.8 U1.2@3332.8,1169.39 ; U1.14@3332.8,975.02 3332.8,1046.61 U1.17@3404.39,1046.61 ; C17.2@3384.02,181.91 3410.93,155 3457.11,155 3581.91,279.79 3679.79,181.91 C13.2@3681.9,181.91 ; C13.2@3684.02,181.91 C13.2@3681.9,181.91 ; C2.2@4281.9,181.91 C2.2@4283.18,181.91 ; C2.2@4284.02,181.91 C2.2@4283.18,181.91 ; C16.2@4586.13,181.91 C16.2@4581.9,181.91 ; C12.2@4884.02,181.91 C12.2@4881.9,181.91 ; C1.2@5481.9,181.91 5477.67,181.91 SW8.2@5379.79,279.79 5257.93,157.93 5205.88,157.93 C8.2@5181.9,181.91 5177.67,181.91 SW7.2@5079.79,279.79 4955,155 4905,155 4881.9,178.1 C12.2@4881.9,181.91 ; C13.2@3681.9,181.91 3681.9,178.1 3700,160 3764.23,160 3884.02,279.79 C9.2@3981.9,181.91 3986.13,181.91 4008.04,160 4062.11,160 4181.91,279.79 4279.79,181.91 C2.2@4283.18,181.91 ; C2.2@4283.18,181.91 4310.09,155 4359.23,155 4484.02,279.79 C16.2@4581.9,181.91 ; C16.2@4581.9,181.91 4578.09,181.91 4605,155 4657.11,155 4781.91,279.79 4879.79,181.91 C12.2@4881.9,181.91
  Top Layer w15: 3215,925 3222,932 3272.83,932 3281.61,940.79 U1.12@3281.61,975.02 ; C14.1@3274.8,889.7 3307.2,922.11 U1.13@3307.2,975.02
  Top Layer w20: C5.2@3245.12,1267.2 3281.61,1230.71 3307.2,1205.12 U1.3@3307.2,1169.39 U1.21@3307.2,1132.2
  Top Layer w40: 3210,900 3230,880 3230,820 3320,730 3660,730 3770,840 5425,840 P3.26@5535,950 ; R37.1@4678.2,3514.93 R37.1@4678.2,3517.43 ; R40.1@5425.2,3500 R40.1@5425.2,3502.5
  other v1: 300,100 400,100 500,100 600,100 900,100 1000,100 1100,100 2100,100 2300,100 2500,100 3000,160 3100,160 3200,160 3300,160 800,200 900,200 1000,200 1100,200 2200,200 2400,200 2940,200 3000,200 3100,200 3200,200 3300,200 3600,200 3900,200 4200,200 4500,200 4800,200 5100,200 5400,200 2900,260 3100,260 3200,260 100,300 200,300 800,300 900,300 1000,300 1100,300 2300,300 2900,320 3100,320 3200,320 2820,340 3260,340 3560,340 3860,340 4160,340 4460,340 4760,340 5060,340 5360,340 3100,380 3200,380 100,400 200,400 800,400 900,400 1000,400 1100,400 2820,400 2900,400 3000,400 3140,400 100,500 200,500 800,500 900,500 1000,500 1100,500 5400,500 100,600 200,600 900,600 1000,600 1100,600 100,700 200,700 300,700 400,700 900,700 1000,700 1100,700 1700,700 1900,700 2100,700 2400,700 2600,700 100,800 200,800 300,800 400,800 500,800 600,800 900,800 1000,800 1100,800 2500,800 3100,800 100,900 200,900 300,900 400,900 500,900 600,900 900,900 1000,900 1700,900 1900,900 2100,900 2300,900 2600,900 3000,900 3100,900 3600,900 3700,900 3800,900 3900,900 4000,900 3700,1000 3800,1000 3900,1000 3282.2,1047.2 3307.2,1047.2 3332.2,1047.2 150,1050 600,1050 3282.2,1072.2 3307.2,1072.2 3332.2,1072.2 3282.2,1097.2 3307.2,1097.2 3332.2,1097.2 1700,1100 1900,1100 2100,1100 2300,1100 2800,1100 2900,1100 150,1150 600,1200 2900,1200 3000,1200 150,1250 600,1300 150,1350 600,1600 150,1650 1050,1650 600,1700 150,1750 1050,1750 1500,1750 1950,1750 600,1800 1500,1850 1950,1850 150,1900 600,1900 1500,1950 1950,1950 150,2000 150,2200 600,2200 1050,2200 2400,2200 1950,2250 150,2300 600,2300 1050,2300 2400,2300 1950,2350 150,2400 600,2400 1050,2400 2400,2400 1500,2450 150,2500 600,2500 1050,2500 3730,2510 3890,2510 4070,2510 4825,2650 4900,2650 4975,2650 4750,2725 4825,2725 4900,2725 4975,2725 200,2800 400,2900 200,3000 5900,3000 300,3100 5900,3150 200,3200 350,3200 1250,3200 2150,3200 3050,3200 3950,3200 4100,3200 4200,3200 4550,3200 4700,3200 3950,3300 4100,3300 4200,3300 5900,3300 3950,3450 4050,3450 5100,3450 5900,3450 4800,3500 4950,3500 5700,3500 3950,3600 4050,3600 5800,3600 5900,3600 200,3700 4300,3700 5800,3700 3950,3750 4050,3750 300,3900 500,3900 700,3900 900,3900 1100,3900 1300,3900 1500,3900 1700,3900 1900,3900 2100,3900 2300,3900 2500,3900 2700,3900 2900,3900 3100,3900 3300,3900 3500,3900 3700,3900 3900,3900 4100,3900 4300,3900
  other v2: 3600,800 3050,850 3650,850 3650,950 2850,1050 3650,1050 3650,1100 3700,1100 3800,1100 4400,1100 4600,1100 4800,1100 5000,1100 2850,1150 2950,1150 3650,1150 2650,1200 2724.96,1199.92 4300,1200 4500,1200 4700,1200 4900,1200 2600,1250 2700,1250 2950,1250 3050,1250 3150,1250 4400,1300 4600,1300 4800,1300 4300,1400 4500,1400 4700,1400 4400,1500 4600,1500 4300,1600 4500,1600 5860,1610 4400,1700 4900,1700 5100,1700 5300,1700 5800,1700 4300,1800 4800,1800 5000,1800 5200,1800 5860,1810 4700,1900 4900,1900 5100,1900 5300,1900 5800,1900 4600,2000 4800,2000 5000,2000 5200,2000 5860,2010 5800,2100 5860,2150 5420,2250 5865,2280 5470,2300 5530,2360 5865,2440 5625,2475 5640,2530 5865,2540 5640,2610 5865,2640 5640,2680 5640,2760 350,3500 500,3500 1100,3500 1250,3500 1400,3500 2000,3500 2150,3500 2300,3500 2900,3500 3050,3500 3200,3500 3800,3500 350,3600 450,3600 1150,3600 1250,3600 1350,3600 2050,3600 2150,3600 2250,3600 2950,3600 3050,3600 3150,3600 3850,3600 350,3700 500,3700 1100,3700 1250,3700 1400,3700 2000,3700 2150,3700 2300,3700 2900,3700 3050,3700 3200,3700 3800,3700 350,3800 450,3800 600,3800 800,3800 1000,3800 1150,3800 1250,3800 1350,3800 1500,3800 1700,3800 1900,3800 2050,3800 2150,3800 2250,3800 2400,3800 2600,3800 2800,3800 2950,3800 3050,3800 3150,3800 3300,3800 3500,3800 3700,3800 3850,3800
NetC1_1: C1.1 R53.1 R54.1 SW8.1 | length 2315.9
  Top Layer w10: R53.1@5150,1650 5150,1620.31 5170,1600.31 5769.69,1600.31 5970,1400 5970,860 5630.21,520.21 SW8.1@5620.21,520.21 5606.29,506.29 5606.29,306.29 C1.1@5518.1,218.1
NetC2_1: C2.1 R55.1 R56.1 SW4.1 | length 3112.6
  Top Layer w10: C2.1@4320.21,218.1 4408.4,306.29 SW4.1@4408.4,506.29 ; SW4.1@4420.21,520.21 4600,700 5610,700 5890,980 5890,1280 5770,1400 5170,1400 ; R55.1@5148.79,1450.59 5148.79,1420.9 5168.79,1400.9
NetC9_1: C9.1 R61.1 R62.1 SW3.1 | length 3338.3
  Top Layer w10: C9.1@4022.33,218.1 4110.52,306.29 SW3.1@4110.52,506.29 ; SW3.1@4120.21,520.21 4330,730 5590,730 5870,1010 5870,1250 v2(5820,1300) ; R61.1@5148.82,1250 5148.82,1221.18 5170,1200 v2(5450,1200)
  Bottom Layer w10: v2(5450,1200) 5550,1300 v2(5820,1300)
NetC12_1: C12.1 R57.1 R58.1 SW6.1 | length 2704.5
  Top Layer w10: C12.1@4920.21,218.1 5008.4,306.29 SW6.1@5008.4,506.29 ; SW6.1@5020.21,520.21 5140,640 5650,640 5930,920 5930,1340 5769.69,1500.31 5170,1500.31 ; R57.1@5148.79,1550.59 5148.79,1520.9 5168.79,1500.9
NetC13_1: C13.1 R59.1 R60.1 SW2.1 | length 3555.6
  Top Layer w10: C13.1@3720.21,218.1 3808.4,306.29 SW2.1@3808.4,506.29 ; SW2.1@3820.21,520.21 SW2.1@3834.13,534.13 ; SW2.1@3868.81,534.13 SW2.1@3834.13,534.13 ; R59.1@5148.79,1350.59 5148.79,1320.9 5168.79,1300.9 ; 5170,1300 5770,1300 5850,1220 5850,1040 5570,760 4060,760 SW2.1@3834.13,534.13
NetC14_2: C14.2 U1.15 | length 96.5
  Top Layer w10: C14.2@3349.6,882.2 3358.39,890.98 U1.15@3358.39,975.02
NetC15_2: C15.2 R33.1 R36.2 U1.16 | length 256.2
  Top Layer w10: U1.16@3404.39,1021.02 3405.22,1020.19 3424.31,1020.19 3504.71,939.8 R33.1@3512.21,939.8 3507.01,934.6 C15.2@3507.01,887.2 ; R36.2@3510.6,813.2 C15.2@3510.6,873.2
NetC17_1: C17.1 R63.1 R64.1 SW1.1 | length 3270.6
  Top Layer w10: C17.1@3418.1,218.1 3506.29,306.29 SW1.1@3506.29,506.29 ; SW1.1@3520.21,520.21 3790,790 5550,790 5610,850 5610,1050 5560,1100 5170,1100 5148.82,1121.18 R63.1@5148.82,1150
NetJP29_1: JP29.1 JP30.3 R37.2 RP1.1 | length 883.5
  Top Layer w20: RP1.1@4396,3358 4458,3358 4600,3500 JP29.1@4600,3750 4754.26,3750 4804.26,3700 JP30.3@4950,3700
NetJP30_1: JP30.1 JP33.1 R40.2 RP2.1 | length 930.2
  Top Layer w20: JP30.1@5150,3700 5301.57,3700 5351.57,3750 JP33.1@5500,3750 R40.2@5500,3500 5500,3492.5 5637.5,3355 RP2.1@5745,3355
NetJP35_2: JP35.2 JP36.7 | length 286.8
  Bottom Layer w20: JP36.7@1825,190 1825,200 1885,260 1985,260 JP35.2@2050,325
NetR34_2: R34.2 U3.6 U3.7 | length 307.4
  Top Layer w20: R34.2@4802.34,3310.78 R34.2@4809.07,3310.78 ; R34.2@4820.1,3310 U3.7@5050,3310 ; U3.6@5050,3360.08 U3.6@5050,3361 ; U3.7@5061,3311 5051.85,3311 5050,3312.85 5050,3359.15 5051.85,3361 U3.6@5061,3361
NetR38_2: R38.2 U3.1 U3.2 | length 172.2
  Top Layer w20: U3.2@5280,3310 5280,3260 5280.77,3259.23 5395.57,3259.23 R38.2@5400,3254.8
NetRP1_2: RP1.2 U3.5 | length 707
  Top Layer w20: RP1.2@4396,3258 4598,3258 4750,3410 U3.5@5040,3410
NetRP2_2: RP2.2 U3.3 | length 508.5
  Top Layer w20: U3.3@5280,3360 5420,3360 5525,3255 RP2.2@5745,3255
P1.0: JP4.2 P1.17 R29.1 | length 4544.8
  Top Layer w10: R29.1@1150,3024.41 1150,2715 1515,2350 JP4.2@1600,2350
  Bottom Layer w10: JP4.2@1600,2350 1671.57,2350 2111.57,2790 4625,2790 4785,2630 4785,2500 P1.17@4735,2450
P1.1: JP4.1 P1.18 R25.1 | length 4505.5
  Top Layer w10: R25.1@1050,3024.41 1050,2786.71 1506.72,2330 1520,2330 JP4.1@1600,2250
  Bottom Layer w10: JP4.1@1600,2250 2120,2770 4600,2770 4740,2630 4740,2555 P1.18@4735,2550
P1.2: JP5.4 P1.19 R30.1 | length 3504.8
  Top Layer w10: JP5.4@2050,2550 1975,2625 1975,2910 2050,2985 R30.1@2050,3024.41
  Bottom Layer w10: JP5.4@2050,2550 2304.01,2550 2504.01,2750 4565,2750 4685,2630 4685,2505 4635,2455 P1.19@4635,2450
P1.3: JP5.3 P1.20 R26.1 | length 3445.3
  Top Layer w10: R26.1@1950,3024.41 1950,2550 JP5.3@2050,2450
  Bottom Layer w10: JP5.3@2050,2450 2232.29,2450 2512.29,2730 4540,2730 4640,2630 4640,2555 P1.20@4635,2550
P1.4: JP5.2 P1.21 R22.1 | length 3673.7
  Top Layer w10: R22.1@1850,3024.41 1848.3,3022.7 1848.3,2986.7 1925,2910 1925,2475 JP5.2@2050,2350
  Bottom Layer w10: JP5.2@2050,2350 2160.58,2350 2520.58,2710 4500,2710 4585,2625 4585,2505 4535,2455 P1.21@4535,2450
P1.5: JP5.1 P1.22 R54.2 | length 4233.3
  Top Layer w10: v2(5060,1660) 5088.82,1660 R54.2@5098.82,1650
  Bottom Layer w10: JP5.1@2050,2250 2071.07,2271.07 2110.08,2271.07 2529.01,2690 4470,2690 4535,2625 P1.22@4535,2550 4535,2539 4485,2489 4485,2420 4425,2360 4425,1915 4680,1660 v2(5060,1660)
P1.6: JP6.4 P1.23 R58.2 | length 3651.4
  Top Layer w10: v2(5064.41,1560) 5088.82,1560 R58.2@5098.82,1550
  Bottom Layer w10: JP6.4@2500,2550 2700,2550 2820,2670 4440,2670 4485,2625 4485,2525 4443.99,2483.99 4443.99,2458.99 4443.99,2448.6 P1.23@4436.57,2448.6 ; P1.23@4435,2450 4435,2447.03 4405,2417.03 4405,1906.72 4751.72,1560 v2(5064.41,1560)
P1.7: JP6.3 P1.24 R56.2 | length 3666.3
  Top Layer w10: v2(5060,1460) 5088.82,1460 R56.2@5098.82,1450
  Bottom Layer w10: JP6.3@2500,2450 2628.28,2450 2828.28,2650 4388.28,2650 4435,2603.28 4435,2540 4428.28,2540 4385,2496.72 4385,1898.43 4823.43,1460 v2(5060,1460)
P2.0: JP6.2 P1.25 R60.2 | length 3728.1
  Top Layer w10: v2(5060,1360) 5088.82,1360 R60.2@5098.82,1350
  Bottom Layer w10: JP6.2@2500,2350 2556.57,2350 2836.57,2630 4379.14,2630 4385,2624.14 4385,2525 4344.39,2484.39 4344.39,2459.39 P1.25@4335,2450 4335,2447.03 4365,2417.03 4365,1890.15 4895.15,1360 v2(5060,1360)
P2.1: JP8.4 P2.1 R24.1 | length 1695.8
  Top Layer w10: JP8.4@3400,2550 3543.43,2550 3730,2736.57 3730,2895 3650,2975 R24.1@3650,3024.41
  Bottom Layer w10: JP8.4@3400,2550 3610,2340 4040,2340 4100,2400 4185,2400 P2.1@4235,2350
P2.2: JP8.3 P2.2 R28.1 | length 1562.7
  Top Layer w10: JP8.3@3400,2450 3471.72,2450 3750,2728.28 R28.1@3750,3024.41
  Bottom Layer w10: JP8.3@3400,2450 3530,2320 4105,2320 P2.2@4135,2350
P2.3: JP8.2 P2.3 R32.1 | length 1737.2
  Top Layer w10: JP8.2@3400,2350 3770,2720 3770,2895 3850,2975 R32.1@3850,3024.41
  Bottom Layer w10: JP8.2@3400,2350 3450,2300 4185,2300 P2.3@4235,2250
P2.4: JP8.1 P2.4 R62.2 | length 2235.5
  Top Layer w10: v2(5060,1260) R62.2@5088.82,1260
  Bottom Layer w10: JP8.1@3400,2250 P2.4@4135,2250 4148.27,2250 4162.26,2236.01 4163.99,2236.01 4200,2200 4260,2200 4345,2115 4345,1881.86 4966.86,1260 v2(5060,1260)
P2.5: JP7.4 P2.5 R31.1 | length 1995.5
  Top Layer w10: JP7.4@2950,2550 2875,2625 2875,2885 2950,2960 R31.1@2950,3024.41
  Bottom Layer w10: JP7.4@2950,2550 3310,2190 4070,2190 4080,2200 4170,2200 4206.01,2163.99 4207.74,2163.99 4221.73,2150 P2.5@4235,2150
P2.6: JP7.3 P2.6 R27.1 | length 1925.1
  Top Layer w10: R27.1@2850,3024.41 2850,2952.69 2855,2947.69 2855,2545 JP7.3@2950,2450
  Bottom Layer w10: JP7.3@2950,2450 3021.57,2450 3301.57,2170 4104.61,2170 4124.61,2150 P2.6@4135,2150
P2.7: JP7.2 P2.7 R64.2 | length 2682.4
  Top Layer w10: v2(5060,1160) R64.2@5088.82,1160
  Bottom Layer w10: JP7.2@2950,2350 3093.28,2350 3293.28,2150 4063.28,2150 4113.28,2100 4185,2100 P2.7@4235,2050 4325,1960 4325,1873.58 5037.62,1160.96 5059.04,1160.96 v2(5060,1160)
P3.0: JP7.1 P2.8 R23.1 | length 2125.1
  Top Layer w10: R23.1@2750,3024.41 2750,2970 2835,2885 2835,2365 JP7.1@2950,2250
  Bottom Layer w10: JP7.1@2950,2250 3165,2250 3285,2130 4055,2130 P2.8@4135,2050
P3.1: JP9.4 P2.9 | length 4117.5
  Bottom Layer w10: JP9.4@250,1950 490,1950 650,2110 3993.28,2110 4103.28,2000 4185,2000 P2.9@4235,1950
P3.2: JP9.3 P2.10 | length 4042.4
  Bottom Layer w10: JP9.3@250,1850 418.28,1850 658.28,2090 3985,2090 4125,1950 P2.10@4135,1950
P3.3: JP9.2 P2.11 | length 4208.7
  Bottom Layer w10: JP9.2@250,1750 350,1750 670,2070 3900,2070 4070,1900 4185,1900 P2.11@4235,1850
P3.4: JP9.1 P2.14 | length 4174.9
  Bottom Layer w10: JP9.1@250,1650 280.43,1680.43 308.72,1680.43 678.28,2050 3835,2050 P2.14@4135,1750
P3.5: JP16.4 P2.15 | length 959.3
  Bottom Layer w10: JP16.4@3400,1950 3819.85,1950 4069.85,1700 4185,1700 P2.15@4235,1650
P3.6: JP16.3 P2.16 | length 884.1
  Bottom Layer w10: JP16.3@3400,1850 3480,1930 3811.57,1930 4090.47,1651.1 4133.9,1651.1 P2.16@4135,1650
P3.7: JP16.2 P2.17 | length 1050.4
  Bottom Layer w10: JP16.2@3400,1750 3560,1910 3803.28,1910 4113.28,1600 4185,1600 P2.17@4235,1550
P4.0: JP16.1 P2.18 | length 975.2
  Bottom Layer w10: JP16.1@3400,1650 3640,1890 3795,1890 P2.18@4135,1550
P4.1: JP15.4 P2.19 R19.1 | length 2690.8
  Top Layer w10: R19.1@2650,3024.41 2650,2250 2805,2095 JP15.4@2950,1950
  Bottom Layer w10: JP15.4@2950,1950 2955,1950 3315,1590 4020.31,1590 4110.31,1500 4185,1500 P2.19@4235,1450
P4.2: JP15.3 P2.20 R15.1 | length 2690.8
  Top Layer w10: R15.1@2550,3024.41 2550,2970 2625,2895 2625,2175 JP15.3@2950,1850
  Bottom Layer w10: JP15.3@2950,1850 3026.72,1850 3306.72,1570 4005,1570 4125,1450 P2.20@4135,1450
P4.3: JP15.2 P2.21 R16.1 | length 2932.2
  Top Layer w10: JP15.2@2950,1750 3300,2100 3300,2705 3450,2855 3450,2993.12 ; 3450,2993.13 R16.1@3450,3024.41
  Bottom Layer w10: JP15.2@2950,1750 3098.43,1750 3298.43,1550 3963.28,1550 4113.28,1400 4180,1400 4230,1350 P2.21@4235,1350
P4.4: JP15.1 P2.22 R20.1 | length 2932.2
  Top Layer w10: JP15.1@2950,1650 3320,2020 3320,2695 3550,2925 R20.1@3550,3024.41
  Bottom Layer w10: JP15.1@2950,1650 3170.15,1650 3290.15,1530 3955,1530 P2.22@4135,1350
P4.5: JP14.4 P2.23 | length 2024.9
  Bottom Layer w10: JP14.4@2500,1950 2516.47,1950 2541.47,1925 2545,1925 2870.43,1599.57 2960,1510 3900,1510 4110,1300 4180,1300 4230,1250 P2.23@4235,1250
P4.6: JP14.3 P2.24 | length 1883.5
  Bottom Layer w10: JP14.3@2500,1850 2590,1850 2950,1490 3000,1490 3890,1490 4130,1250 P2.24@4135,1250
P4.7: JP14.2 P2.25 | length 1983.5
  Bottom Layer w10: JP14.2@2500,1750 2660,1750 2940,1470 3000,1470 3840,1470 4110,1200 4185,1200 P2.25@4235,1150